# Altium PCB GR_Action.PcbDoc
Units mil, origin at the board's own origin, x right, y up, seen from the top; angles counter-clockwise.
Board outline 3110.24 x 3070.87 mil, 2 copper layers (Top Layer, Bottom Layer); 101 components, 79 nets, 324 pads, 31 vias.
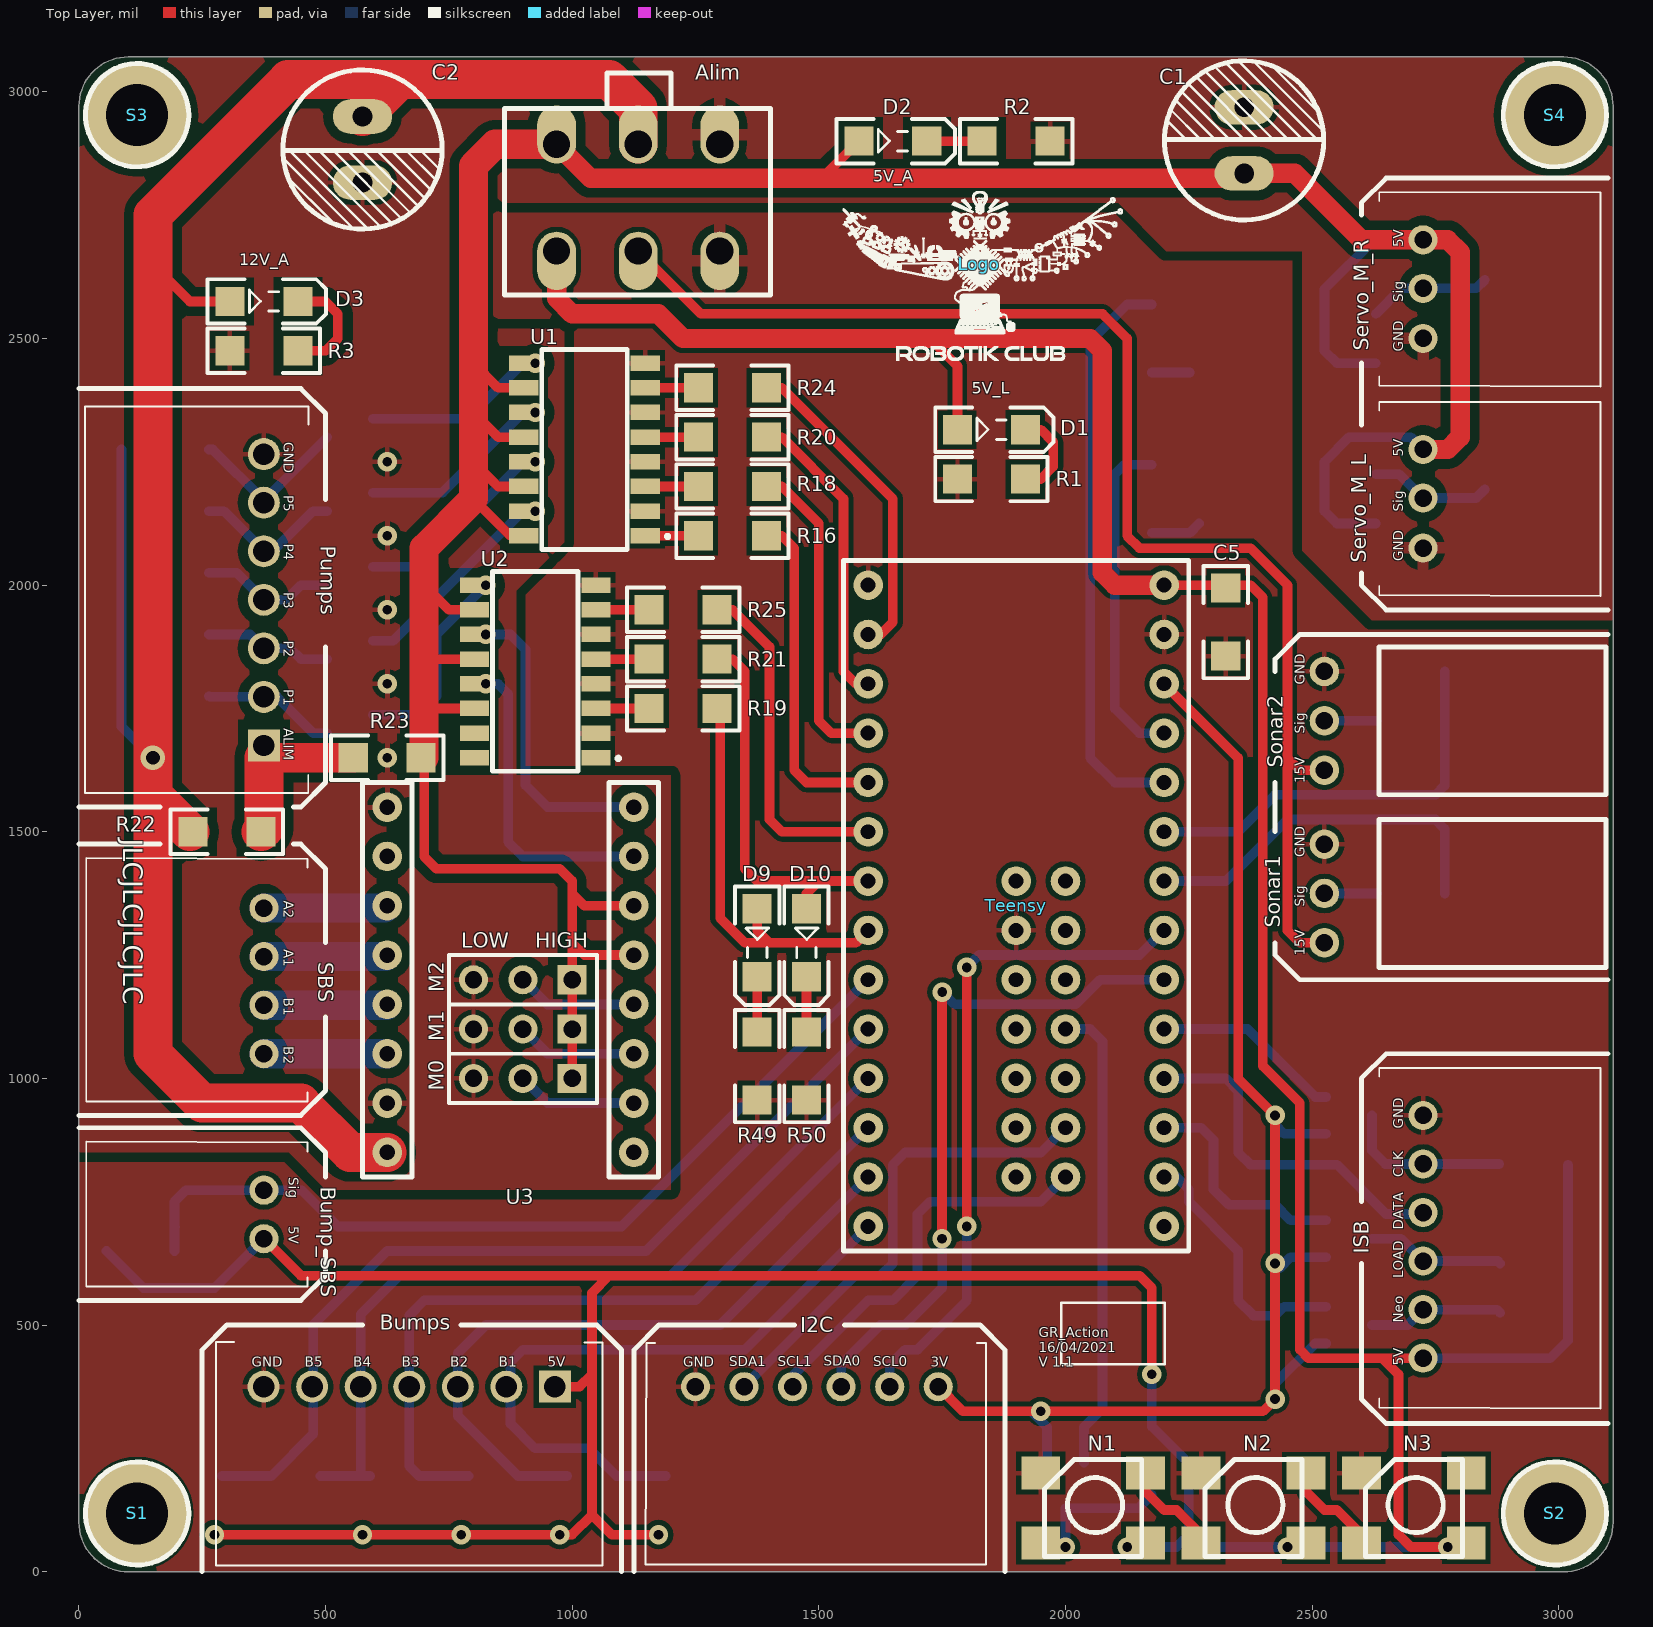
[diagram p0: Top Layer view]
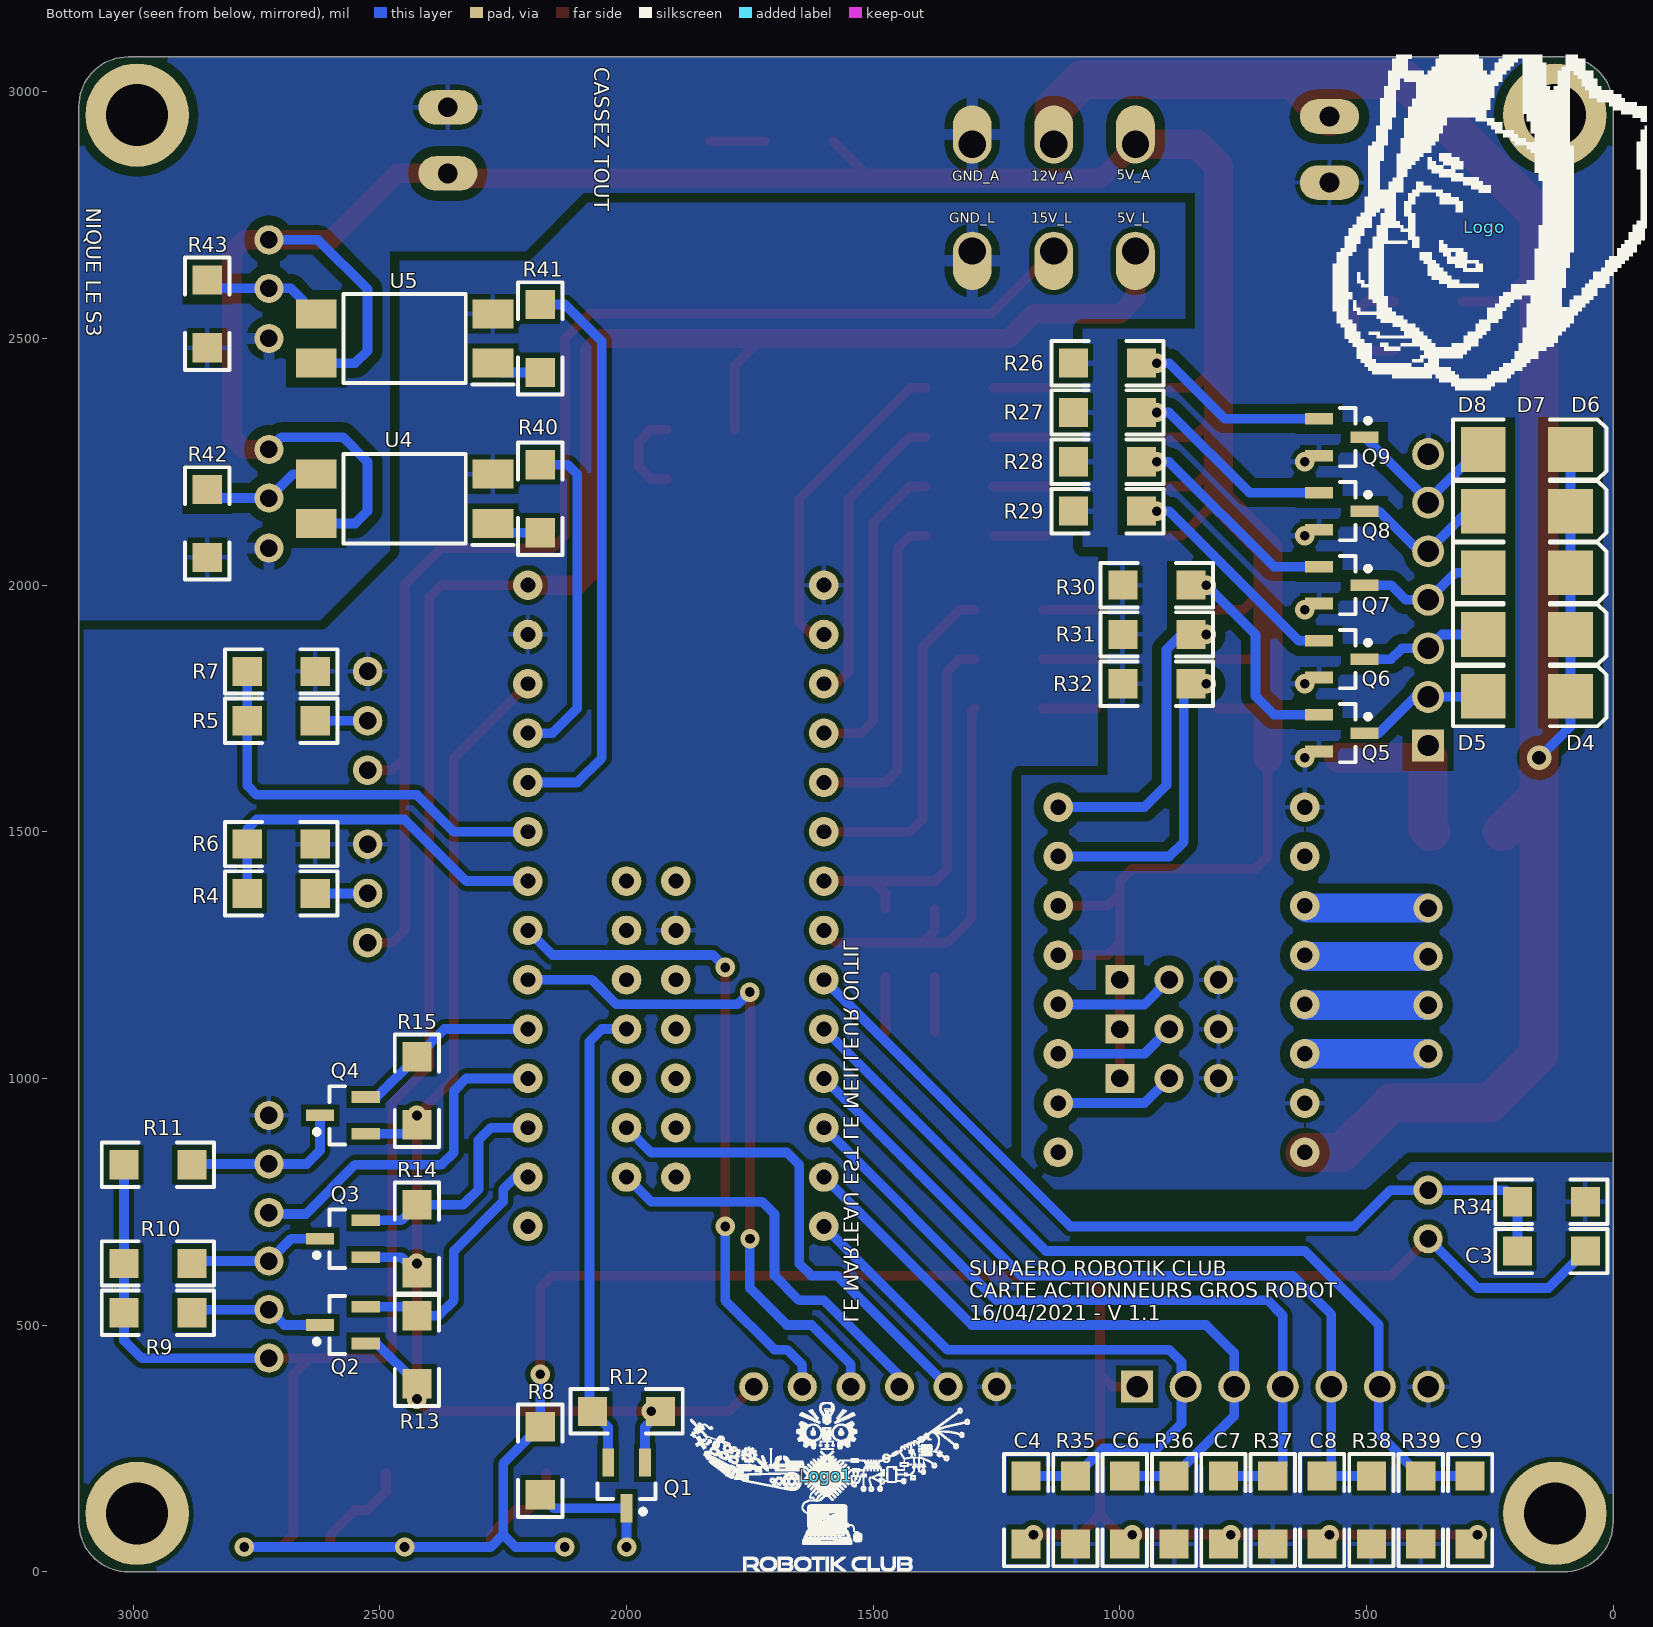
[diagram p1: Bottom Layer view, seen from below]

## Layer stack, top to bottom
Top Solder: solder mask 0.4, Solder Resist, Dk 3.5
Top Layer: signal copper 1.4
Dielectric 1: dielectric 12.6, FR-4, Dk 4.8
Bottom Layer: signal copper 1.4
Bottom Solder: solder mask 0.4, Solder Resist, Dk 3.5

## Board outline
1496.06,0 3010.24,0 ccw(c3010.24,100) 3110.24,100 3110.24,1417.32 3110.24,2970.87 ccw(c3010.24,2970.87) 3010.24,3070.87 1811.02,3070.87 100,3070.87 ccw(c100,2970.87) 0,2970.87 0,1141.73 0,100 ccw(c100,100) 100,0 1496.06,0

## Design rules (kind name [scope] priority, off if disabled: settings)
Clearance Clearance_GND_A [InNet('GND_A')] p1: gap=10 except(19.68: Arc-Poly Track-Poly SMDPad-Poly THPad-Poly Via-Poly Fill-Poly Poly-Poly Poly-Region Poly-Text)
Clearance [All] p2: gap=10 except(29.53: Poly-Poly)
ComponentClearance ComponentClearance_Logo [HasFootprint('Logo_lowres')] p1: gap=0 collisioncheckmode=3 verticalgap=0 showdistances=FALSE
ComponentClearance ComponentClearance_1206_C [HasFootprint('Capacitor 1206')] p2: gap=0 collisioncheckmode=3 verticalgap=0 showdistances=FALSE
ComponentClearance ComponentClearance_1206_DD [HasFootprint('SMB')] p3: gap=0 collisioncheckmode=3 verticalgap=0 showdistances=FALSE
ComponentClearance ComponentClearance_1206_R [HasFootprint('Resistor 1206')] p4: gap=0 collisioncheckmode=3 verticalgap=0 showdistances=FALSE
ComponentClearance ComponentClearance_M0 [HasFootprint('HDR1X3')] p5: gap=0 collisioncheckmode=3 verticalgap=0 showdistances=FALSE
ComponentClearance ComponentClearance_1206_D [HasFootprint('KP-3216SEC')] p6: gap=0 collisioncheckmode=3 verticalgap=0 showdistances=FALSE
ComponentClearance ComponentClearance_1 [All] p7: gap=10 collisioncheckmode=3 verticalgap=10 showdistances=FALSE
PolygonConnect PolygonConnect_Minifit [HasFootprint('MOLEX_MINIFITJR_3X2')] p1: connectstyle=Relief reliefconductorwidth=23.62 reliefentries=4 polygonreliefangle="90 Angle" airgapwidth=15.75
PolygonConnect PolygonConnect_GND_A [InNet('GND_A') vs HasFootprint('MOLEX_MINIFITJR_3X2') Or HasFootprint('S5B-XH-A') Or HasFootprint('S4B-XH-A' )Or HasFootprint('S3B-XH-A')] p2: connectstyle=Relief reliefconductorwidth=23.62 reliefentries=4 polygonreliefangle="90 Angle" airgapwidth=15.75
PolygonConnect [All] p3: connectstyle=Relief reliefconductorwidth=10 reliefentries=4 polygonreliefangle="90 Angle" airgapwidth=10
RoutingVias [All] p1: holewidth=28 width=50 viastyle="Through Hole" minholewidth=28 minwidth=50 maxholewidth=28 maxwidth=50
SilkToSilkClearance [All] p1 off: silktosilkclearance=10
SolderMaskExpansion [All] p1: expansion=4
Width [All] p1: maxlimit=78.74 minlimit=9.84 preferedwidth=19.68
28 further rules are at their usual default settings.

## Classes and differential pairs
component class GR_Action_Ascensseur: Bump_SBS Bumps C3 C4 C6 C7 C8 C9 D4 D5 D6 D7 D8 D9 D10 M0 M1 M2 Pumps Q5 Q6 Q7 Q8 Q9 R16 R18 R19 R20 R21 R22 R23 R24 R25 R26 R27 R28 R29 R30 R31 R32 R34 R35 R36 R37 R38 R39 R40 R41 R42 R43 R49 R50 SBS Servo_M_L Servo_M_R U1 U2 U3 U4 U5
component class GR_Action: Alim C1 C2 C5 D1 D2 D3 I2C ISB N1 N2 N3 Q1 Q2 Q3 Q4 R1 R2 R3 R4 R5 R6 R7 R8 R9 R10 R11 R12 R13 R14 R15 S1 S2 S3 S4 Sonar1 Sonar2 Teensy

## Components (designator, comment, footprint, x,y, rotation, side; value= is the part's Value field where it differs from the comment)
Alim "MinifitJr 3x2H" MOLEX_MINIFITJR_3X2 1299.21,2677.17 r180 top
Bump_SBS "Header 2H" S2B-XH-A 375,675 r90 top
Bumps "Header 7H" S7B-XH-A 965,375 r180 top
C1 "Cap2" Condensateur 2362.2,2834.65 r90 top
C2 "Cap2" Condensateur 575,2950 r270 top
C3 "" "Capacitor 1206" 125,650 r180 bottom
C4 "" "Capacitor 1206" 1190,125 r270 bottom
C5 "(Optinal)" "Capacitor 1206" 2325,1925 r90 top
C6 "" "Capacitor 1206" 990,125 r270 bottom
C7 "" "Capacitor 1206" 790,125 r270 bottom
C8 "" "Capacitor 1206" 590,125 r270 bottom
C9 "" "Capacitor 1206" 290,125 r270 bottom
D1 "5V_L" KP-3216SEC 1850,2315 r0 top
D2 "5V_A" KP-3216SEC 1650,2900 r0 top
D3 "12V_A" KP-3216SEC 375,2575 r0 top
D4 "LGE SS12" SMB 175,1775 r90 bottom
D5 "LGE SS12" SMB 175,1900 r90 bottom
D6 "LGE SS12" SMB 175,2025 r90 bottom
D7 "LGE SS12" SMB 175,2150 r90 bottom
D8 "LGE SS12" SMB 175,2275 r90 bottom
D9 "Dir" KP-3216SEC 1375,1275 r270 top
D10 "Step" KP-3216SEC 1475,1275 r270 top
I2C "Header 6H" S6B-XH-A 1742.13,375 r180 top
ISB "Header 6H" S6B-XH-A 2725,925 r270 top
Logo "Comment" BG 260,2725 r0 bottom
Logo "Comment" Logo_lowres 1825,2650 r0 top
Logo1 "Comment" Logo_lowres 1595,195 r180 bottom
M0 "Header 3" HDR1X3 1000,1000 r180 top
M1 "Header 3" HDR1X3 1000,1100 r180 top
M2 "Header 3" HDR1X3 1000,1200 r180 top
N1 "WS2812C" WS2812C 1950,200 r0 top
N2 "WS2812C" WS2812C 2275,200 r0 top
N3 "WS2812C" WS2812C 2600,200 r0 top
Pumps "Header 7H" S7B-XH-A 375,1675 r90 top
Q1 "MOSFET-N" SOT23_M 2000,175 r270 bottom
Q2 "MOSFET-N" SOT23_M 2575,500 r0 bottom
Q3 "MOSFET-N" SOT23_M 2575,675 r0 bottom
Q4 "MOSFET-N" SOT23_M 2575,925 r0 bottom
Q5 "MOSFET-N" SOT23_M 550,1700 r180 bottom
Q6 "MOSFET-N" SOT23_M 550,1850 r180 bottom
Q7 "MOSFET-N" SOT23_M 550,2000 r180 bottom
Q8 "MOSFET-N" SOT23_M 550,2150 r180 bottom
Q9 "MOSFET-N" SOT23_M 550,2300 r180 bottom
R1 "Res2" "Resistor 1206" 1850,2215 r0 top
R2 "Res2" "Resistor 1206" 1900,2900 r0 top
R3 "Res2" "Resistor 1206" 375,2475 r180 top
R4 "Res2" "Resistor 1206" 2700,1375 r0 bottom
R5 "Res2" "Resistor 1206" 2700,1725 r0 bottom
R6 "Res2" "Resistor 1206" 2700,1475 r180 bottom
R7 "Res2" "Resistor 1206" 2700,1825 r180 bottom
R8 "Res2" "Resistor 1206" 2175,225 r90 bottom
R9 "Res2" "Resistor 1206" 2950,525 r0 bottom
R10 "Res2" "Resistor 1206" 2950,625 r0 bottom
R11 "Res2" "Resistor 1206" 2950,825 r0 bottom
R12 "Res2" "Resistor 1206" 2000,325 r180 bottom
R13 "Res2" "Resistor 1206" 2425,450 r270 bottom
R14 "Res2" "Resistor 1206" 2425,675 r270 bottom
R15 "Res2" "Resistor 1206" 2425,975 r270 bottom
R16 "Res2" "Resistor 1206" 1325,2100 r0 top
R18 "Res2" "Resistor 1206" 1325,2200 r0 top
R19 "Res2" "Resistor 1206" 1225,1750 r0 top
R20 "Res2" "Resistor 1206" 1325,2300 r0 top
R21 "Res2" "Resistor 1206" 1225,1850 r0 top
R22 "Res2" "Resistor 1206" 300,1500 r0 top
R23 "Res2" "Resistor 1206" 625,1650 r180 top
R24 "Res2" "Resistor 1206" 1325,2400 r0 top
R25 "Res2" "Resistor 1206" 1225,1950 r0 top
R26 "Res2" "Resistor 1206" 1025,2450 r180 bottom
R27 "Res2" "Resistor 1206" 1025,2350 r180 bottom
R28 "Res2" "Resistor 1206" 1025,2250 r180 bottom
R29 "Res2" "Resistor 1206" 1025,2150 r180 bottom
R30 "Res2" "Resistor 1206" 925,2000 r180 bottom
R31 "Res2" "Resistor 1206" 925,1900 r180 bottom
R32 "Res2" "Resistor 1206" 925,1800 r180 bottom
R34 "Res2" "Resistor 1206" 125,750 r0 bottom
R35 "Res2" "Resistor 1206" 1090,125 r90 bottom
R36 "Res2" "Resistor 1206" 890,125 r90 bottom
R37 "Res2" "Resistor 1206" 690,125 r90 bottom
R38 "Res2" "Resistor 1206" 490,125 r90 bottom
R39 "Res2" "Resistor 1206" 390,125 r90 bottom
R40 "Res2" "Resistor 1206" 2175,2175 r90 bottom
R41 "Res2" "Resistor 1206" 2175,2500 r90 bottom
R42 "Res2" "Resistor 1206" 2850,2125 r90 bottom
R43 "Res2" "Resistor 1206" 2850,2550 r90 bottom
R49 "Res2" "Resistor 1206" 1375,1025 r90 top
R50 "Res2" "Resistor 1206" 1475,1025 r90 top
S1 "Screw M3" "Screw M3" 118.11,118.11 r0 top
S2 "Screw M3" "Screw M3" 2992.13,118.11 r0 top
S3 "Screw M3" "Screw M3" 118.11,2952.76 r0 top
S4 "Screw M3" "Screw M3" 2992.13,2952.76 r0 top
SBS "Header 4" S4B-XH-A 375,1050 r90 top
Servo_M_L "S3B-XH-A" S3B-XH-A 2725,2275 r270 top
Servo_M_R "S3B-XH-A" S3B-XH-A 2725,2700 r270 top
Sonar1 "KK254" "MOLEX KK254 3X1H M" 2525,1275 r90 top
Sonar2 "KK254" "MOLEX KK254 3X1H M" 2525,1625 r90 top
Teensy "Teensy 3.2" teensy 1500,1200 r0 top
U1 "PhotoCoupler" LTV-247 1025,2275 r90 top
U2 "PhotoCoupler" LTV-247 925,1825 r90 top
U3 "DRV8825" DRV8825 1125,850 r180 top
U4 "FOD817S" SOP254P1016X385-4N 2450,2175 r0 bottom
U5 "FOD817S" SOP254P1016X385-4N 2450,2500 r0 bottom

## Footprints (in the part's own frame and the unit in brackets; to place one, negate y for a bottom-side part, rotate by r counter-clockwise, add the part's x,y. Pads: shape width x height; smd on the part's side, far side on the other; paste and mask are expansions set on the pad)
BG [mil]
  silkscreen extent -340,-350 308,330
"Capacitor 1206" [mm]
  rect 1.5x1.5 smd: 1(-1.75,0) 2(1.75,0)
  silkscreen extent -2.89,-1.14 2.89,1.14, body extent -1.98,-0.99 1.98,0.96, height 1.3
Condensateur [mil]
  oval 70x120 hole 40: 1(0,0) 2(133.86,0)
  silkscreen extent -94,-161 228,161, body extent -93,-160 227,160, height 500
DRV8825 [mil] "Stepper Driver"
  round 60 hole 31.5: 1(0,0) 2(0,-100) 3(0,-200) 4(0,-300) 5(0,-400) 6(0,-500) 7(0,-600) 8(0,-700) 9(500,-700) 10(500,-600) 11(500,-500) 12(500,-400) 13(500,-300) 14(500,-200) 15(500,-100) 16(500,0)
  silkscreen extent -50,-750 550,50, body extent -50,-764 550,63, height 446
HDR1X3 [mm] "Connector; Header; 3 Position"
  rect 1.5x1.5 hole 0.9: 1(0,0)
  round 1.5 hole 0.9: 2(2.54,0) 3(5.08,0)
  silkscreen extent -1.27,-1.27 6.35,1.27
KP-3216SEC [mm]
  rect 1.5x1.5 smd: 1(-1.75,0) 2(1.75,0)
  silkscreen extent -2.89,-1.14 3.2,1.14, body extent -1.7,-0.79 1.5,0.81, height 1.1
Logo_lowres [mil]
  silkscreen extent -276,-194 291,148
LTV-247 [mm]
  rect 0.8x1.5 smd: 1(-4.445,-3.125) 2(-3.175,-3.125) 3(-1.905,-3.125) 4(-0.635,-3.125) 5(0.635,-3.125) 6(1.905,-3.125) 7(3.175,-3.125) 8(4.445,-3.125) 9(-4.445,3.125) 10(-3.175,3.125) 11(-1.905,3.125) 12(-0.635,3.125) 13(0.635,3.125) 14(1.905,3.125) 15(3.175,3.125) 16(4.445,3.125)
  silkscreen extent -5.14,-4.34 5.14,2.2
"MOLEX KK254 3X1H M" [mil]
  round 60 hole 35.43: 1(0,0) 2(100,0) 3(200,0)
  silkscreen extent -50,-571 250,-110, body extent -50,-570 250,11, height 230
MOLEX_MINIFITJR_3X2 [mm] "MOLEX_MINIFITJR_3X2, 39-28-1063"
  oval 2x3 hole 1.4 copper offset 0,0.5: 1(0,0) 3(4.2,0) 5(8.4,0)
  oval 2x3 hole 1.4 copper offset 0,-0.5: 2(0,-5.5) 4(4.2,-5.5) 6(8.4,-5.5)
  silkscreen extent -2.62,-9.17 11.07,2.26, body extent -3.1,-8.75 11.5,2.25, height 12.8
"Resistor 1206" [mm]
  rect 1.5x1.5 smd: 1(-1.75,0) 2(1.75,0)
  silkscreen extent -2.89,-1.14 2.89,1.14, body extent -1.98,-0.95 1.98,0.93, height 0.55
S2B-XH-A [mm]
  round 1.5 hole 0.9: 1(0,0) 2(2.5,0)
  silkscreen extent -2.45,-2.26 5,9.14, body extent -2.41,-2.32 4.99,9.18, height 6.15
S3B-XH-A [mm]
  round 1.5 hole 0.9: 1(0,0) 2(2.5,0) 3(5.08,0)
  silkscreen extent -2.45,-2.26 7.54,9.14, body extent -2.44,-2.27 7.46,9.23, height 6.15
S4B-XH-A [mm]
  round 1.5 hole 0.9: 1(0,0) 2(2.5,0) 3(5,0) 4(7.5,0)
  silkscreen extent -2.45,-2.26 10.08,9.14, body extent -2.44,-2.32 9.96,9.18, height 6.15
S6B-XH-A [mm]
  round 1.5 hole 0.9: 1(0,0) 2(2.5,0) 3(5,0) 4(7.5,0) 5(10,0) 6(12.5,0)
  silkscreen extent -2.45,-2.26 15.08,9.14, body extent -2.45,-2.3 14.95,9.2, height 6.15
S7B-XH-A [mm]
  rect 1.65x1.65 hole 1.1: 1(0,0)
  round 1.65 hole 1.1: 2(2.5,0) 3(5,0) 4(7.5,0) 5(10,0) 6(12.5,0) 7(15,0)
  silkscreen extent -2.45,-2.3 17.45,9.2, body extent -2.45,-2.34 17.45,9.16, height 6.17
"Screw M3" [mm] "M3 iso Screw"
  round 5.32 hole 3.2 unplated: 0(0,0)
  silkscreen extent -2.66,-2.66 2.66,2.66
SMB [mm] "SMB Didoe"
  rect 2.3x2.3 smd: 1(0,2.25) 2(0,-2.25)
  silkscreen extent -1.55,-4.1 1.55,3.8, body extent -1.84,-2.67 1.78,2.62, height 2.2
SOP254P1016X385-4N [mm]
  rect 2.1x1.5 smd: 1(-4.55,1.27) 2(-4.55,-1.27) 3(4.55,-1.27) 4(4.55,1.27)
  silkscreen extent -5.6,-2.3 3.15,2.37, body extent -3.53,-1.4 3.48,1.44, height 2.21
SOT23_M [mm] "SOT23, 3-Leads, Body 2.9x1.3mm, Pitch 0.95mm, Lead Span 2.3mm - Reverse Pinning, IPC Low Density"
  rect 1.45x0.6 smd: 1(1.175,0) 2(-1.175,-0.95) 3(-1.175,0.95)
  silkscreen extent -0.1,-1.5 1.47,1.5, body extent -0.7,-1.5 0.7,1.5, height 1.1
teensy [mil] "Teensy 3.2"
  round 60 hole 30: 0(100,700) 1(100,600) 2(100,500) 3(100,400) 4(100,300) 5(100,200) 6(100,100) 7(100,0) 8(100,-100) 9(100,-200) 10(100,-300) 11(100,-400) 12(100,-500) 13(700,-500) 14(700,-400) 15(700,-300) 16(700,-200) 17(700,-100) 18(700,0) 19(700,100) 20(700,200) 21(700,300) 22(700,400) 23(700,500) 24(400,0) 25(400,-100) 26(400,-200) 27(400,-300) 28(400,-400) 29(500,-400) 30(500,-300) 31(500,-200) 32(500,-100) 33(500,0) 36(400,200) 37(500,200) 39(500,100) 40(400,100) 41(700,600) 42(700,700) 43(700,800) 44(100,800)
  silkscreen extent 50,-550 750,850, body extent 49,-561 753,904, height 468
WS2812C [mm]
  rect 2x1.7 smd: 1(5.4,-3.6) 2(5.4,0) 3(0,0) 4(0,-3.6)
  silkscreen extent 0.2,-4.3 5.2,0.7, body extent 0.19,-4.33 5.19,0.67, height 2

## Part data
Alim: library part "Header 3X2H", "Header, 3-Pin, Dual row, Right Angle"
Bump_SBS: "Header, 2-Pin, Right Angle"
Bumps Pumps: "Header, 7-Pin, Right Angle"
C1 C2: "Capacitor"
C3 C4 C5 C6 C7 C8 C9: library part Cap, "Capacitor"
D1 D2 D3 D9 D10: library part LED2, "Typical RED, GREEN, YELLOW, AMBER GaAs LED"
D4 D5 D6 D7 D8: library part Diode, "Default Diode"
I2C ISB: "Header, 6-Pin, Right Angle"
M0 M1 M2: "Header, 3-Pin"
N1 N2 N3: "Intelligent control LED"
Q1 Q2 Q3 Q4 Q5 Q6 Q7 Q8 Q9: "N-Channel MOSFET"
R1 R2 R3 R4 R5 R6 R7 R8 R9 R10 R11 R12 R13 R14 R15 R16 R18 R19 R20 R21 R22 R23 R24 R25 R26 R27 R28 R29 R30 R31 R32 R34 R35 R36 R37 R38 R39 R40 R41 R42 R43 R49 R50: "Resistor"
SBS: "Header, 4-Pin"
Servo_M_L Servo_M_R Sonar1 Sonar2: library part "Header 3H", "Header, 3-Pin, Right Angle"
Teensy: library part teensy3.2
U1 U2: library part LTV-247, "Integrated Circuit"
U3: "Stepper Driver Module"
U4 U5: library part Optoisolator1, "4-Pin Phototransistor Optocoupler"

## Via types
v1: diameter 39.37, hole 19.68, Top Layer to Bottom Layer, 30 vias
v2: diameter 50, hole 28, Top Layer to Bottom Layer, 1 vias

## Nets (pads, with @x,y where several pads share a name; then routed paths per layer and width w, separated by ;. In a path a pad name is that pad's centre, name@x,y a point inside that pad or via, vN(x,y) a via of type N, cw(c..) or ccw(c..) an arc to the next point about the centre after c; other vN are vias at no path point)
3V_L: I2C.1 Q1.3 Q2.3 Q3.3 Q4.3 R12.2 R13.2 R14.2 R15.2 Teensy.41 | length 2726.2
  Top Layer w19.68: I2C.1 1792.13,325 v1(1950,325) 2400,325 v1(2425,350) v1(2425,625) v1(2425,925) 2350,1000 2350,1650 Teensy.41
  Bottom Layer w19.68: R12.2 1962.6,293.5 Q1.3 ; R13.2 2506.5,462.6 Q2.3 ; R15.2 2443.5,887.6 Q4.3 ; R14.2@2434.45,615.55 2456.5,637.6 Q3.3
5V_A: Alim.6 C1.1 D2.1 M0.1 M1.1 M2.1 R23.1 Servo_M_L.1 Servo_M_R.1 U1.9 U1.11 U1.13 U1.15 U2.11 U2.13 U2.15 U3.5 U3.6 U4.4 U5.4 | length 6856.5
  Top Layer w19.68: R23.1@700,1650 700,1450 725,1425 975,1425 1000,1400 1000,1375 ; 700,1875 725,1850 U2.13 ; 700,2000 750,1950 U2.15 ; 725,1750 U2.11 ; 800,2175 875,2100 U1.9 ; 800,2250 850,2200 U1.11 ; 800,2350 850,2300 U1.13 ; 800,2450 850,2400 U1.15 ; M0.1 M1.1 M2.1 1000,1275 ; U3.5 1025,1250 1000,1275 ; U3.6 1025,1350 1000,1375 ; 1500,2824.65 1505.75,2824.65 D2.1 ; 1000,1275 1000,1375
  Top Layer w39.37: Alim.6 1037.56,2824.65 1162.46,2824.65 1162.82,2825 1270.25,2825 1270.61,2824.65 1500,2824.65 ; 1505.75,2824.65 2352.2,2824.65 C1.1 2465.35,2834.65 2600,2700 Servo_M_R.1 2775,2700 2800,2675 2800,2300 2775,2275 Servo_M_L.1
  Top Layer w59.06: R23.1@700,1650 700,1875 700,2000 700,2075 800,2175 800,2250 800,2350 800,2450 800,2850 843.7,2893.7 Alim.6
  Bottom Layer w19.68: U4.4 2550,2125 2525,2150 2525,2250 2575,2300 2700,2300 Servo_M_L.1 ; U5.4 2550,2450 2525,2475 2525,2600 2625,2700 Servo_M_R.1
5V_L: Alim.5 Bump_SBS.1 Bumps.1 C3.2 C4.2 C5.2 C6.2 C7.2 C8.2 C9.2 D1.1 ISB.6 N1.1 N2.1 N3.1 R8.2 R9.2 R10.2 R11.2 Teensy.43 | length 10162.7
  Top Layer w19.68: v1(275,75) v1(575,75) v1(775,75) v1(975,75) 1000,75 1040,115 ; Bump_SBS.1 450,600 2150,600 2175,575 v1(2175,400) ; Bumps.1 1015,375 1040,400 ; 1075,600 1040,565 1040,400 ; v1(1175,75) 1080,75 1040,115 ; 1725,2500 1781.1,2443.9 D1.1 ; Teensy.43 2375,2000 2400,1975 2400,1025 2475,950 2475,450 2492.13,432.87 2642.13,432.87 ; ISB.6 2642.13,432.87 ; v1(2775,50) 2700,50 2675,75 2675,400 2642.13,432.87 ; 1040,115 1040,400
  Top Layer w39.37: Alim.5 968.5,2581.5 1000,2550 1175,2550 1225,2500 1725,2500 2050,2500 2075,2475 2075,2025 2100,2000 Teensy.43
  Bottom Layer w19.68: C3.2 131.1,575 275,575 Bump_SBS.1 ; v1(2125,50) 2225,50 2250,75 ; v1(2175,400) R8.2 2250,218.9 2250,75 ; ISB.6 2982.87,432.87 3018.9,468.9 R9.2 R10.2 R11.2 ; v1(2775,50) 2275,50 2250,75
  other v1: 2450,50
12V_A: Alim.4 C2.1 D3.1 D4.2 D5.2 D6.2 D7.2 D8.2 R22.1 U3.16 | length 4509.5
  Top Layer w19.68: 150,2650 225,2575 D3.1 ; R22.1@225,1500 R22.1
  Top Layer w78.74: R22.1@225,1500 150,1575 ; 423.99,3025 650,3025 ; 424.49,3024.49 150,2750 150,2650 v2(150,1650) 150,1575 ; C2.1 650,3025 ; U3.16 550,850 450,950 250,950 150,1050 150,1575 ; Alim.4 1133.86,2966.14 1075,3025 650,3025
  Bottom Layer w19.68: D8.2 D7.2 D6.2 D5.2 D4.2 86.42,1713.58 v2(150,1650)
15V_S: Alim.3 Sonar1.1 Sonar2.1 | length 2701.7
  Top Layer w19.68: Alim.3 1261.02,2550 2075,2550 2125,2500 2125,2100 2150,2075 2375,2075 2450,2000 2450,1650 ; Sonar1.1 2475,1275 2450,1300 2450,1650 ; Sonar2.1 2475,1625 2450,1650
ALIM_P: Pumps.1 R22.2 R23.2 | length 333.6
  Top Layer w59.06: Pumps.1@375,1650 R23.2
  Top Layer w78.74: R22.2 375,1506.1 Pumps.1@375,1650
BUMP_1: Bumps.2 C4.1 R35.2 Teensy.12 | length 1322.9
  Bottom Layer w19.68: C4.1 R35.2 1033.9,250 925,250 875,300 875,425 900,450 1350,450 Teensy.12
BUMP_2: Bumps.3 C6.1 R36.2 Teensy.11 | length 1379.4
  Bottom Layer w19.68: C6.1 R36.2 768.15,315.75 768.15,443.15 825,500 1300,500 Teensy.11
BUMP_3: Bumps.4 C7.1 R37.2 Teensy.10 | length 1522
  Bottom Layer w19.68: C7.1 R37.2 669.72,214.17 669.72,519.72 700,550 1250,550 Teensy.10
BUMP_4: Bumps.5 C8.1 R38.2 Teensy.9 | length 1654.4
  Bottom Layer w19.68: R38.2 C8.1@571.3,193.9 ; C8.1 C8.1@571.3,193.9 ; Teensy.9 1200,600 650,600 571.3,521.3 Bumps.5 C8.1@571.3,193.9
BUMP_5: Bumps.6 C9.1 R39.2 Teensy.8 | length 1814.8
  Bottom Layer w19.68: C9.1 R39.2 475,278.9 475,500 625,650 1150,650 Teensy.8
GND_A: Alim.2 C1.2 C2.2 M0.3 M1.3 M2.3 Pumps.7 Q5.2 Q6.2 Q7.2 Q8.2 Q9.2 R2.2 R3.2 R26.1 R27.1 R28.1 R29.1 R30.1 R31.1 R32.1 R42.1 R43.1 Servo_M_L.3 Servo_M_R.3 U3.9 U3.15
  other v1: 625,1650 625,1800 625,1950 625,2100 625,2250
GND_L: Alim.1 Bumps.7 C5.1 I2C.6 ISB.1 N1.3 N2.3 N3.3 R1.1 R6.2 R7.2 R34.1 R35.1 R36.1 R37.1 R38.1 R39.1 R49.1 R50.1 Sonar1.3 Sonar2.3 Teensy.40 Teensy.42 Teensy.44 U1.2 U1.4 U1.6 U1.8 U2.2 U2.4 U2.6 U2.8 U4.2 U5.2
ISB_CLOCK: ISB.2 Q4.1 R11.1 | length 340.8
  Bottom Layer w19.68: Q4.1 2621.26,853.74 2648.43,826.57 ISB.2 R11.1@2879.53,826.57
ISB_LOADING: ISB.4 Q3.1 R10.1 | length 280.6
  Bottom Layer w19.68: Q3.1 2679.72,675 ISB.4 2876.38,629.72 R10.1
ISB_NEOPIXEL: ISB.5 Q2.1 R9.1 | length 275.4
  Bottom Layer w19.68: Q2.1 2693.7,500 ISB.5 2874.8,531.3 R9.1
NEOPIXEL: N1.4 Q1.1 R8.1 | length 265.1
  Bottom Layer w19.68: v1(2000,50) Q1.1 2147.64,128.74 R8.1
NetD1_2: D1.2 R1.2 | length 182.9
  Top Layer w19.68: R1.2 1950,2215 1975,2240 1975,2290 1950,2315 D1.2
NetD2_2: D2.2 R2.1 | length 112.2
  Top Layer w19.68: D2.2 R2.1
NetD3_2: D3.2 R3.1 | length 232.9
  Top Layer w19.68: R3.1 500,2475 525,2500 525,2550 500,2575 D3.2
NetD9_2: D9.2 R49.2 | length 112.2
  Top Layer w19.68: R49.2 D9.2
NetD10_2: D10.2 R50.2 | length 112.2
  Top Layer w19.68: R50.2 D10.2
NetN1_2: N1.2 N2.4 | length 202.9
  Top Layer w19.68: N1.2 2162.6,162.4 2200,125 2225,125 2275,75 N2.4
NetN2_2: N2.2 N3.4 | length 202.9
  Top Layer w19.68: N2.2 2487.6,162.4 2525,125 2550,125 2600,75 N3.4
NetR16_1: R16.1 U1.1 | length 108.1
  Top Layer w19.68: U1.1 R16.1
NetR17_1: U2.1
NetR18_1: R18.1 U1.3 | length 108.1
  Top Layer w19.68: U1.3 R18.1
NetR19_1: R19.1 U2.3 | length 108.1
  Top Layer w19.68: U2.3 R19.1
NetR20_1: R20.1 U1.5 | length 108.1
  Top Layer w19.68: U1.5 R20.1
NetR21_1: R21.1 U2.5 | length 108.1
  Top Layer w19.68: U2.5 R21.1
NetR24_1: R24.1 U1.7 | length 108.1
  Top Layer w19.68: U1.7 R24.1
NetR25_1: R25.1 U2.7 | length 108.1
  Top Layer w19.68: U2.7 R25.1
NetR33_2: U2.10
NetR40_1: R40.1 U4.1 | length 103.7
  Bottom Layer w19.68: R40.1 2251.97,2106.1 U4.1
NetR41_1: R41.1 U5.1 | length 77
  Bottom Layer w19.68: R41.1 U5.1@2251.97,2431.1
NetSBS_1: SBS.1 U3.14 | length 250
  Bottom Layer w59.06: SBS.1 U3.14
NetSBS_2: SBS.2 U3.13 | length 250.7
  Bottom Layer w59.06: SBS.2 623.43,1148.43 U3.13
NetSBS_3: SBS.3 U3.12 | length 246.9
  Bottom Layer w59.06: SBS.3 U3.12@621.85,1246.85
NetSBS_4: SBS.4 U3.11 | length 245.3
  Bottom Layer w59.06: SBS.4 U3.11@620.28,1345.28
O_PUMP_1: Q5.3 R30.2 U2.16 | length 410.7
  Bottom Layer w19.68: Q5.3 687.4,1737.4 725,1775 725,1900 v1(825,2000)
O_PUMP_2: Q6.3 R29.2 U1.10 | length 437.5
  Bottom Layer w19.68: Q6.3 637.4,1887.4 900,2150 v1(925,2150)
O_PUMP_3: Q7.3 R28.2 U1.12 | length 416.8
  Bottom Layer w19.68: Q7.3 687.4,2037.4 900,2250 v1(925,2250)
O_PUMP_4: Q8.3 R27.2 U1.14 | length 396.1
  Bottom Layer w19.68: Q8.3 737.4,2187.4 900,2350 v1(925,2350)
O_PUMP_5: Q9.3 R26.2 U1.16 | length 375.4
  Bottom Layer w19.68: Q9.3 787.4,2337.4 900,2450 v1(925,2450)
O_SBS_DIR: R32.2 U2.12 U3.7 | length 620.7
  Bottom Layer w19.68: v1(825,1800) 850,1800 870.31,1779.68 870.31,1479.68 900,1450 U3.7
O_SBS_STEP: R31.2 U2.14 U3.8 | length 606.1
  Bottom Layer w19.68: v1(825,1900) 875,1900 905.47,1869.53 905.47,1594.53 950,1550 U3.8
PUMP_1: D4.1 Pumps.2 Q5.1 | length 271.2
  Bottom Layer w19.68: D4.1 265.16,1773.43 Pumps.2 401.57,1773.43 475,1700 Q5.1
PUMP_2: D5.1 Pumps.3 Q6.1 | length 260.9
  Bottom Layer w19.68: D5.1 346.85,1900 Pumps.3 428.15,1871.85 450,1850 Q6.1
PUMP_3: D6.1 Pumps.4 Q7.1 | length 275.1
  Bottom Layer w19.68: D6.1 320.28,2025 Pumps.4 420.28,1970.28 450,2000 Q7.1
PUMP_4: D7.1 Pumps.5 Q8.1 | length 307.5
  Bottom Layer w19.68: D7.1 293.7,2150 Pumps.5 393.7,2068.7 475,2150 Q8.1
PUMP_5: D8.1 Pumps.6 Q9.1 | length 336.5
  Bottom Layer w19.68: D8.1 271.26,2275 375,2171.26 Q9.1
SBS_M0: M0.2 U3.2 | length 245.7
  Bottom Layer w19.68: M0.2 950,950 U3.2
SBS_M1: M1.2 U3.3 | length 245.7
  Bottom Layer w19.68: M1.2 950,1050 U3.3
SBS_M2: M2.2 U3.4 | length 245.7
  Bottom Layer w19.68: M2.2 950,1150 U3.4
SERVO_M_L: R42.2 Servo_M_L.2 U4.3 | length 248.1
  Bottom Layer w19.68: U4.3 2676.57,2225 Servo_M_L.2 2832.68,2176.57 R42.2
SERVO_M_R: R43.2 Servo_M_R.2 U5.3 | length 249.4
  Bottom Layer w19.68: U5.3 2680.71,2601.57 Servo_M_R.2 2832.68,2601.57 R43.2
SONAR_1: R4.1 Sonar1.2 | length 106.1
  Bottom Layer w19.68: Sonar1.2 R4.1
SONAR_2: R5.1 Sonar2.2 | length 106.1
  Bottom Layer w19.68: Sonar2.2 R5.1
T_BUMP_SBS: Bump_SBS.2 C3.1 R34.2 Teensy.7 | length 1755.6
  Bottom Layer w19.68: C3.1 193.9,700 ; 195.47,698.43 193.9,700 ; Teensy.7 1100,700 525,700 451.57,773.43 Bump_SBS.2 217.32,773.43 R34.2 193.9,700
T_I2C_0_SCL: I2C.2 Teensy.19 | length 1360.1
  Top Layer w19.68: v1@1800,700.31 v1(1800,1225)
  Bottom Layer w19.68: I2C.2 1643.7,418.7 1675,450 1700,450 1800,550 v1@1800,700 ; v1(1800,1225) 1825,1250 2150,1250 Teensy.19
  other v1: 1799.68,700
T_I2C_0_SDA: I2C.3 Teensy.18 | length 1395.2
  Top Layer w19.68: v1(1749.68,675) 1749.68,1174.68 v1(1750,1175)
  Bottom Layer w19.68: I2C.3 1545.28,420.28 1625,500 1675,500 1750,575 v1@1750,675 ; v1(1750,1175) 1750.32,1175 1775.16,1150.16 2020.65,1150.16 2070.49,1200 Teensy.18
T_I2C_1_SCL: I2C.4 Teensy.29 | length 815.2
  Bottom Layer w19.68: I2C.4 1446.85,396.85 1600,550 1650,550 1700,600 1700,725 1725,750 1950,750 Teensy.29
T_I2C_1_SDA: I2C.5 Teensy.30 | length 986.2
  Bottom Layer w19.68: I2C.5 1573.43,600 1625,600 1650,625 1650,825 1675,850 1950,850 Teensy.30
T_ISB_CLOCK: Q4.2 R15.1 Teensy.17 | length 385.7
  Bottom Layer w19.68: Teensy.17 2368.9,1100 R15.1 2506.5,962.4 Q4.2
T_ISB_LOADING: Q3.2 R14.1 Teensy.15 | length 465
  Bottom Layer w19.68: Teensy.15 2275,900 2300,875 2300,775 2331.1,743.9 R14.1 2456.5,712.4 Q3.2
T_ISB_NEOPIXEL: Q2.2 R13.1 Teensy.14 | length 526.1
  Bottom Layer w19.68: Teensy.14 2225,800 2250,775 2250,750 2350,650 2350,550 2381.1,518.9 R13.1 2443.5,537.4 Q2.2
T_ISB_SERIAL: ISB.3 Teensy.16 | length 713.4
  Bottom Layer w19.68: Teensy.16 2325,1000 2350,975 2350,850 2375,825 2550,825 2650,725 2721.85,725 ISB.3
T_NEOPIXEL: Q1.2 R12.1 Teensy.32 | length 954.7
  Bottom Layer w19.68: Teensy.32 2050,1100 2075,1075 2075,331.1 R12.1 2037.4,293.5 Q1.2
T_PUMP_1: R25.2 Teensy.4 | length 697.5
  Top Layer w19.68: R25.2 1325,1950 1400,1875 1400,1525 1425,1500 Teensy.4
T_PUMP_2: R16.2 Teensy.3 | length 676.8
  Top Layer w19.68: R16.2 1425,2100 1450,2075 1450,1625 1475,1600 Teensy.3
T_PUMP_3: R18.2 Teensy.2 | length 647.5
  Top Layer w19.68: R18.2 1425,2200 1500,2125 1500,1725 1525,1700 Teensy.2
T_PUMP_4: R20.2 Teensy.1 | length 618.2
  Top Layer w19.68: R20.2 1425,2300 1550,2175 1550,1825 1575,1800 Teensy.1
T_PUMP_5: R24.2 Teensy.0 | length 659.7
  Top Layer w19.68: R24.2 1425,2400 1650,2175 1650,1925 1625,1900 Teensy.0
T_SBS_L_DIR: D9.1 R19.2 Teensy.6 | length 837.8
  Top Layer w19.68: R19.2 1300,1743.9 1300,1325 1350,1275 1400,1275 ; D9.1 1375,1300 1400,1275 ; Teensy.6 1575,1275 1400,1275
T_SBS_L_STEP: D10.1 R21.2 Teensy.5 | length 793.3
  Top Layer w19.68: R21.2 1325,1850 1350,1825 1350,1425 1375,1400 1500,1400 ; D10.1 1475,1375 1500,1400 ; Teensy.5 1500,1400
T_SERVO_M_L: R40.2 Teensy.23 | length 678.5
  Bottom Layer w19.68: R40.2 2118.9,2243.9 2100,2225 2100,1750 2150,1700 Teensy.23
T_SERVO_M_R: R41.2 Teensy.22 | length 1170.7
  Bottom Layer w19.68: R41.2 2125,2568.9 2050,2493.9 2050,1650 2100,1600 Teensy.22
T_SONAR_1: R4.2 R6.1 Teensy.20 | length 759.6
  Bottom Layer w19.68: Teensy.20 2325,1400 2450,1525 2750,1525 2768.9,1506.1 R6.1 R4.2
T_SONAR_2: R5.2 R7.1 Teensy.21 | length 838.9
  Bottom Layer w19.68: Teensy.21 2350,1500 2425,1575 2750,1575 2768.9,1593.9 R5.2 R7.1
pads on no net: N3.2 S1.0 S2.0 S3.0 S4.0 Teensy.13 Teensy.24 Teensy.25 Teensy.26 Teensy.27 Teensy.28 Teensy.31 Teensy.33 Teensy.36 Teensy.37 Teensy.39 U2.9 U3.1 U3.10

## Polygon pours and split planes (outlines as drawn)
GND_A on Top Layer "Top GND_A" (solid, pour order 0): 0,850 425,850 500.45,774.55 1200,774.55 1200,1614.17 886.21,1614.17 886.21,1988.57 984.25,2086.61 984.25,2519.68 850,2519.68 850,2775 2106.89,2775 2204.72,2677.17 2480.32,2677.17 2480.31,2069.69 2620.87,1929.13 3110.24,1929.13 3110.24,2970.87 ccw(c3010.24,2970.87) 3010.24,3070.87 2834.65,3070.87 100,3070.87 ccw(c100,2970.87) 0,2970.87 0,2519.68
GND_L on Top Layer "Top GND_L" (solid, pour order 6): 1600,3075 3000,3075 cw(c3000,2975) 3100,2975 3100,1350 3100,100 cw(c3000,100) 3000,0 1675,0 100,0 cw(c100,100) 0,100 0,1550 0,2975 cw(c100,2975) 100,3075 1600,3075
GND_A on Bottom Layer "Bot GND_A" (solid, pour order 2): 0,850 416.93,850 500,775 1200,775 1200,1614.17 1025,1614.17 1025,2077.36 1075,2077.36 1075,2519.68 846.84,2519.68 846.84,2795.28 2086.61,2795.28 2204.72,2677.17 2480.32,2677.17 2480.31,2069.68 2620.87,1929.13 3110.24,1929.13 3110.24,2970.87 ccw(c3010.24,2970.87) 3010.24,3070.87 2834.65,3070.87 100,3070.87 ccw(c100,2970.87) 0,2970.87 0,2519.68
GND_L on Bottom Layer "Bot GND_L" (solid, remove dead copper, pour order 8): 1600,3075 3000,3075 cw(c3000,2975) 3100,2975 3100,1350 3100,100 cw(c3000,100) 3000,0 1675,0 100,0 cw(c100,100) 0,100 0,1550 0,2975 cw(c100,2975) 100,3075 1600,3075

## Silkscreen, mask and mechanical layers (free items; w line width, h text height)
Top Overlay:
  lines w5: 1991.3,420.08 2201.3,420.08 2201.3,545.08 1991.3,545.08 1991.3,420.08
  lines w10: 0,550 450,550 500,600 500,650 ; 0,900 450,900 500,850 500,800 ; 0,925 450,925 500,975 500,1125 ; 0,1475 165,1475 ; 0,1550 165,1550 ; 0,2398.43 450,2398.43 500,2348.43 500,2173.43 ; 250,0 250,450 300,500 575,500 ; 435,1475 450,1475 500,1425 500,1275 ; 435,1550 450,1550 500,1600 500,1875 ; 775,500 1050,500 1100,450 1100,0 ; 1125.55,0 1125.55,450 1175.55,500 1450.55,500 ; 1552.13,500 1827.13,500 1877.13,450 1877.13,0 ; 2425,1275 2425,1250 2475,1200 3100,1200 ; 2425,1500 2425,1600 ; 2425,1825 2425,1850 2475,1900 3100,1900 ; 2600,625 2600,350 2650,300 3100,300 ; 2600,750 2600,1000 2650,1050 3100,1050 ; 2600,2025 2600,2000 2650,1950 3100,1950 ; 2600,2325 2600,2450 ; 2600,2750 2600,2775 2650,2825 3100,2825
  text "5V_A" at 1610,2810 h40
  text "5V" at 2685,2685 h20 r90
  text "12V_A" at 325,2640 h40
  text "Sig" at 2685,2573.43 h20 r90
  text "GND" at 2685,2473.43 h20 r90
  text "5V_L" at 1810,2380 h40
  text "GND" at 415,2290 h20 r270
  text "5V" at 2685,2260 h20 r90
  text "P5" at 415,2182.13 h20 r270
  text "Sig" at 2685,2148.43 h20 r90
  text "P4" at 415,2083.7 h20 r270
  text "GND" at 2685,2048.43 h20 r90
  text "P3" at 415,1985.28 h20 r270
  text "P2" at 415,1886.85 h20 r270
  text "GND" at 2485,1798.43 h20 r90
  text "P1" at 415,1788.43 h20 r270
  text "ALIM" at 415,1710 h20 r270
  text "Sig" at 2485,1698.43 h20 r90
  text "15V" at 2485,1598.43 h20 r90
  text "JLCJLCJLCJLC" at 89.49,1485.35 h39.37 r270
  text "GND" at 2485,1448.43 h20 r90
  text "A2" at 415,1360.28 h20 r270
  text "Sig" at 2485,1348.43 h20 r90
  text "LOW" at 775,1265 h30
  text "HIGH" at 925,1265 h30
  text "A1" at 415,1261.85 h20 r270
  text "15V" at 2485,1248.43 h20 r90
  text "B1" at 415,1163.43 h20 r270
  text "B2" at 415,1065 h20 r270
  text "GND" at 2685,898.43 h20 r90
  text "Sig" at 425,800 h20 r270
  text "CLK" at 2685,800 h20 r90
  text "5V" at 425,700 h20 r270
  text "DATA" at 2685,693.43 h20 r90
  text "LOAD" at 2685,595 h20 r90
  text "Neo" at 2685,505 h20 r90
  text "SDA0" at 1510,417 h20
  text "5V" at 2685,417.87 h20 r90
  text "SDA1" at 1318,416 h20
  text "SCL1" at 1416.43,416 h20
  text "SCL0" at 1610,416 h20
  text "GND" at 350,415 h20
  text "B5" at 457.87,415 h20
  text "B4" at 556.3,415 h20
  text "B3" at 654.72,415 h20
  text "B2" at 753.15,415 h20
  text "B1" at 851.57,415 h20
  text "5V" at 950,415 h20
  text "GND" at 1225.55,415 h20
  text "3V" at 1727.13,415 h20
  text "GR_Action / 16/04/2021 / V 1.1" at 1946.3,415.08 h20
Bottom Overlay:
  text "CASSEZ TOUT" at 2065,3050 h30 r90
  text "5V_A" at 1006.5,2821.3 h20
  text "12V_A" at 1180,2820 h20
  text "GND_A" at 1340,2820 h20
  text "NIQUE LE S3" at 3095,2765 h30 r90
  text "5V_L" at 1005,2735 h20
  text "15V_L" at 1180,2735 h20
  text "GND_L" at 1345.35,2735 h20
  text "SUPAERO ROBOTIK CLUB / CARTE ACTIONNEURS GROS ROBOT / 16/04/2021 - V 1.1" at 1305,510 h30
  text "LE MARTEAU EST LE MEILLEUR OUTIL" at 1560,505 h30 r90
Mechanical 2:
  lines w10: 0,50 ccw(c50,50) 50,0 2007.87,0 3060.24,0 ccw(c3060.24,50) 3110.24,50 3110.24,2362.2 3110.24,3020.87 ccw(c3060.24,3020.87) 3060.24,3070.87 50,3070.87 ccw(c50,3020.87) 0,3020.87 0,50

## Dimensions
0,2970.87 to 118.11,2952.76 on Mechanical 3
118.11,2952.76 to 100,3070.87 on Mechanical 3
1811.02,3070.87 to 3010.24,0 on Mechanical 3
3110.24,2970.87 to 0,2970.87 on Mechanical 3